# Altium PCB ABPG.PcbDoc (part 1 of 2)
Units mm, origin at the board's own origin, x right, y up, seen from the top; angles counter-clockwise.
Board outline 54.5 x 112.5 mm, 4 copper layers (Top Layer, Layer 1, Layer 2, Bottom Layer), stack 0.603 mm thick; 177 components, 78 nets, 524 pads, 877 vias.
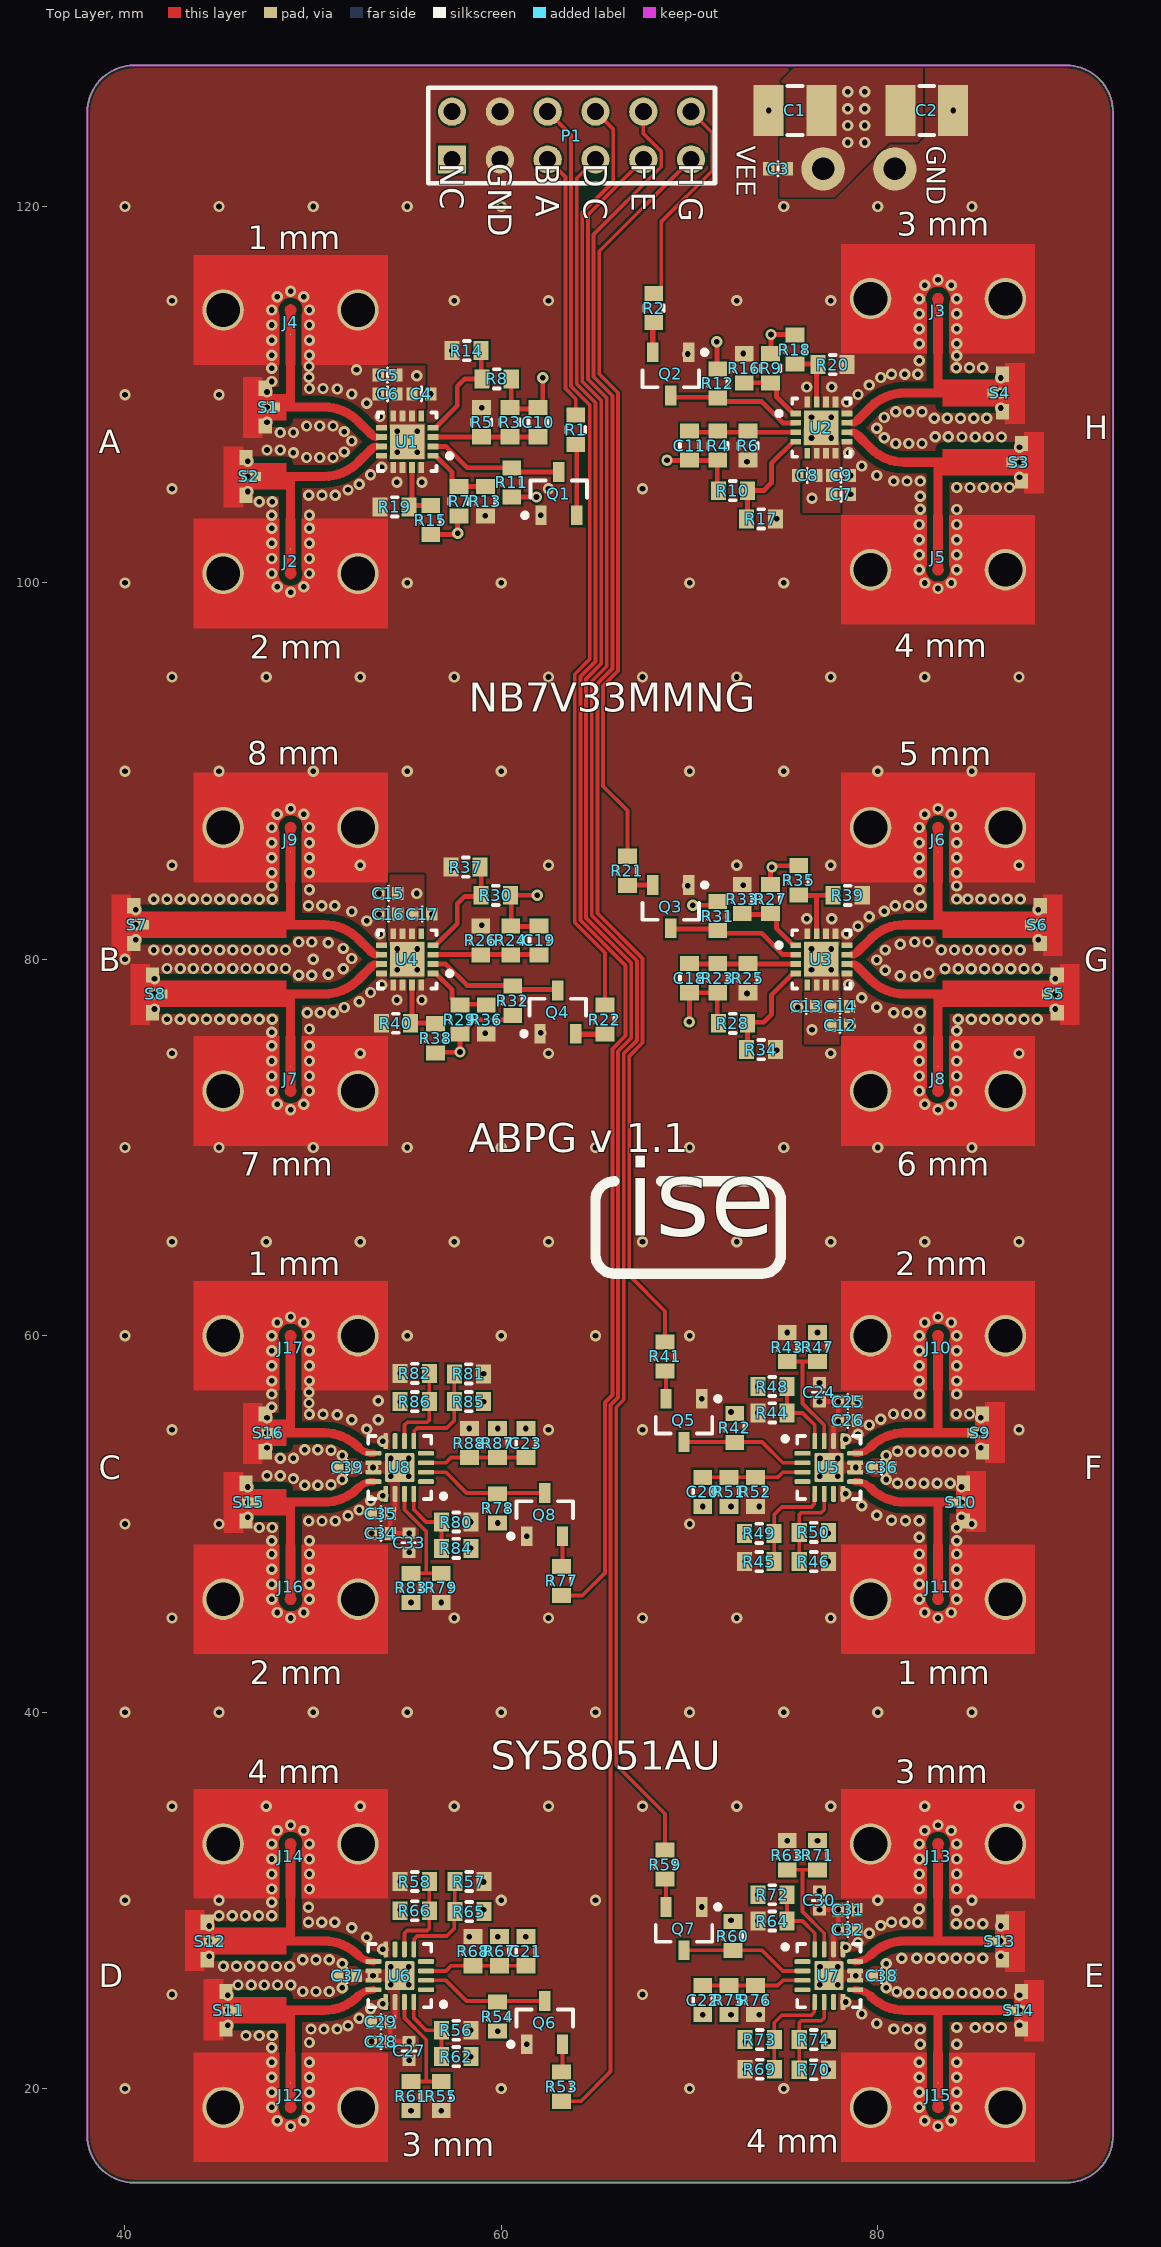
[diagram p0: Top Layer view]
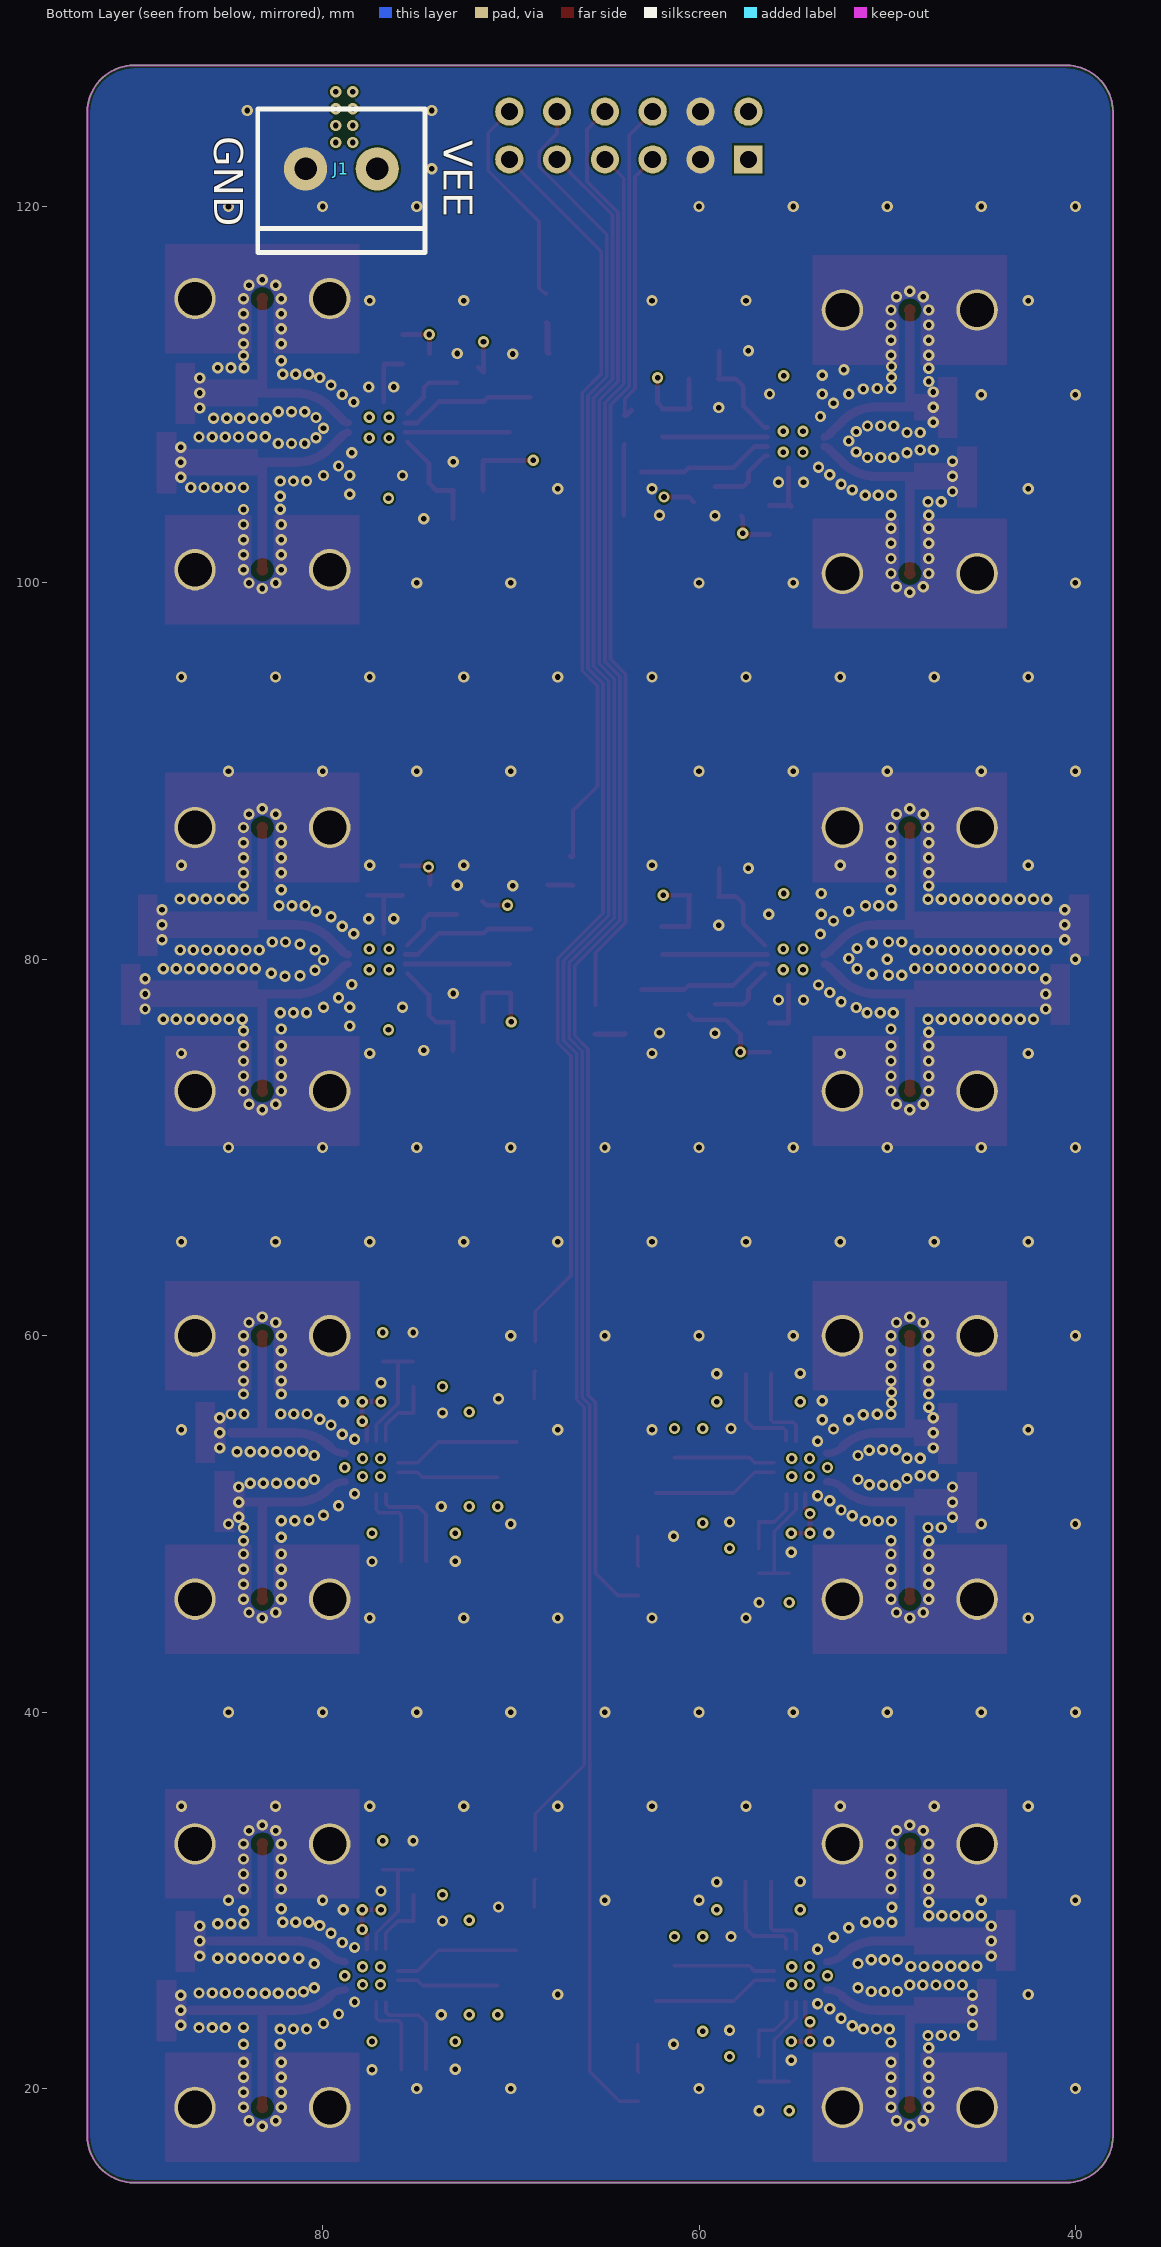
[diagram p1: Bottom Layer view, seen from below]
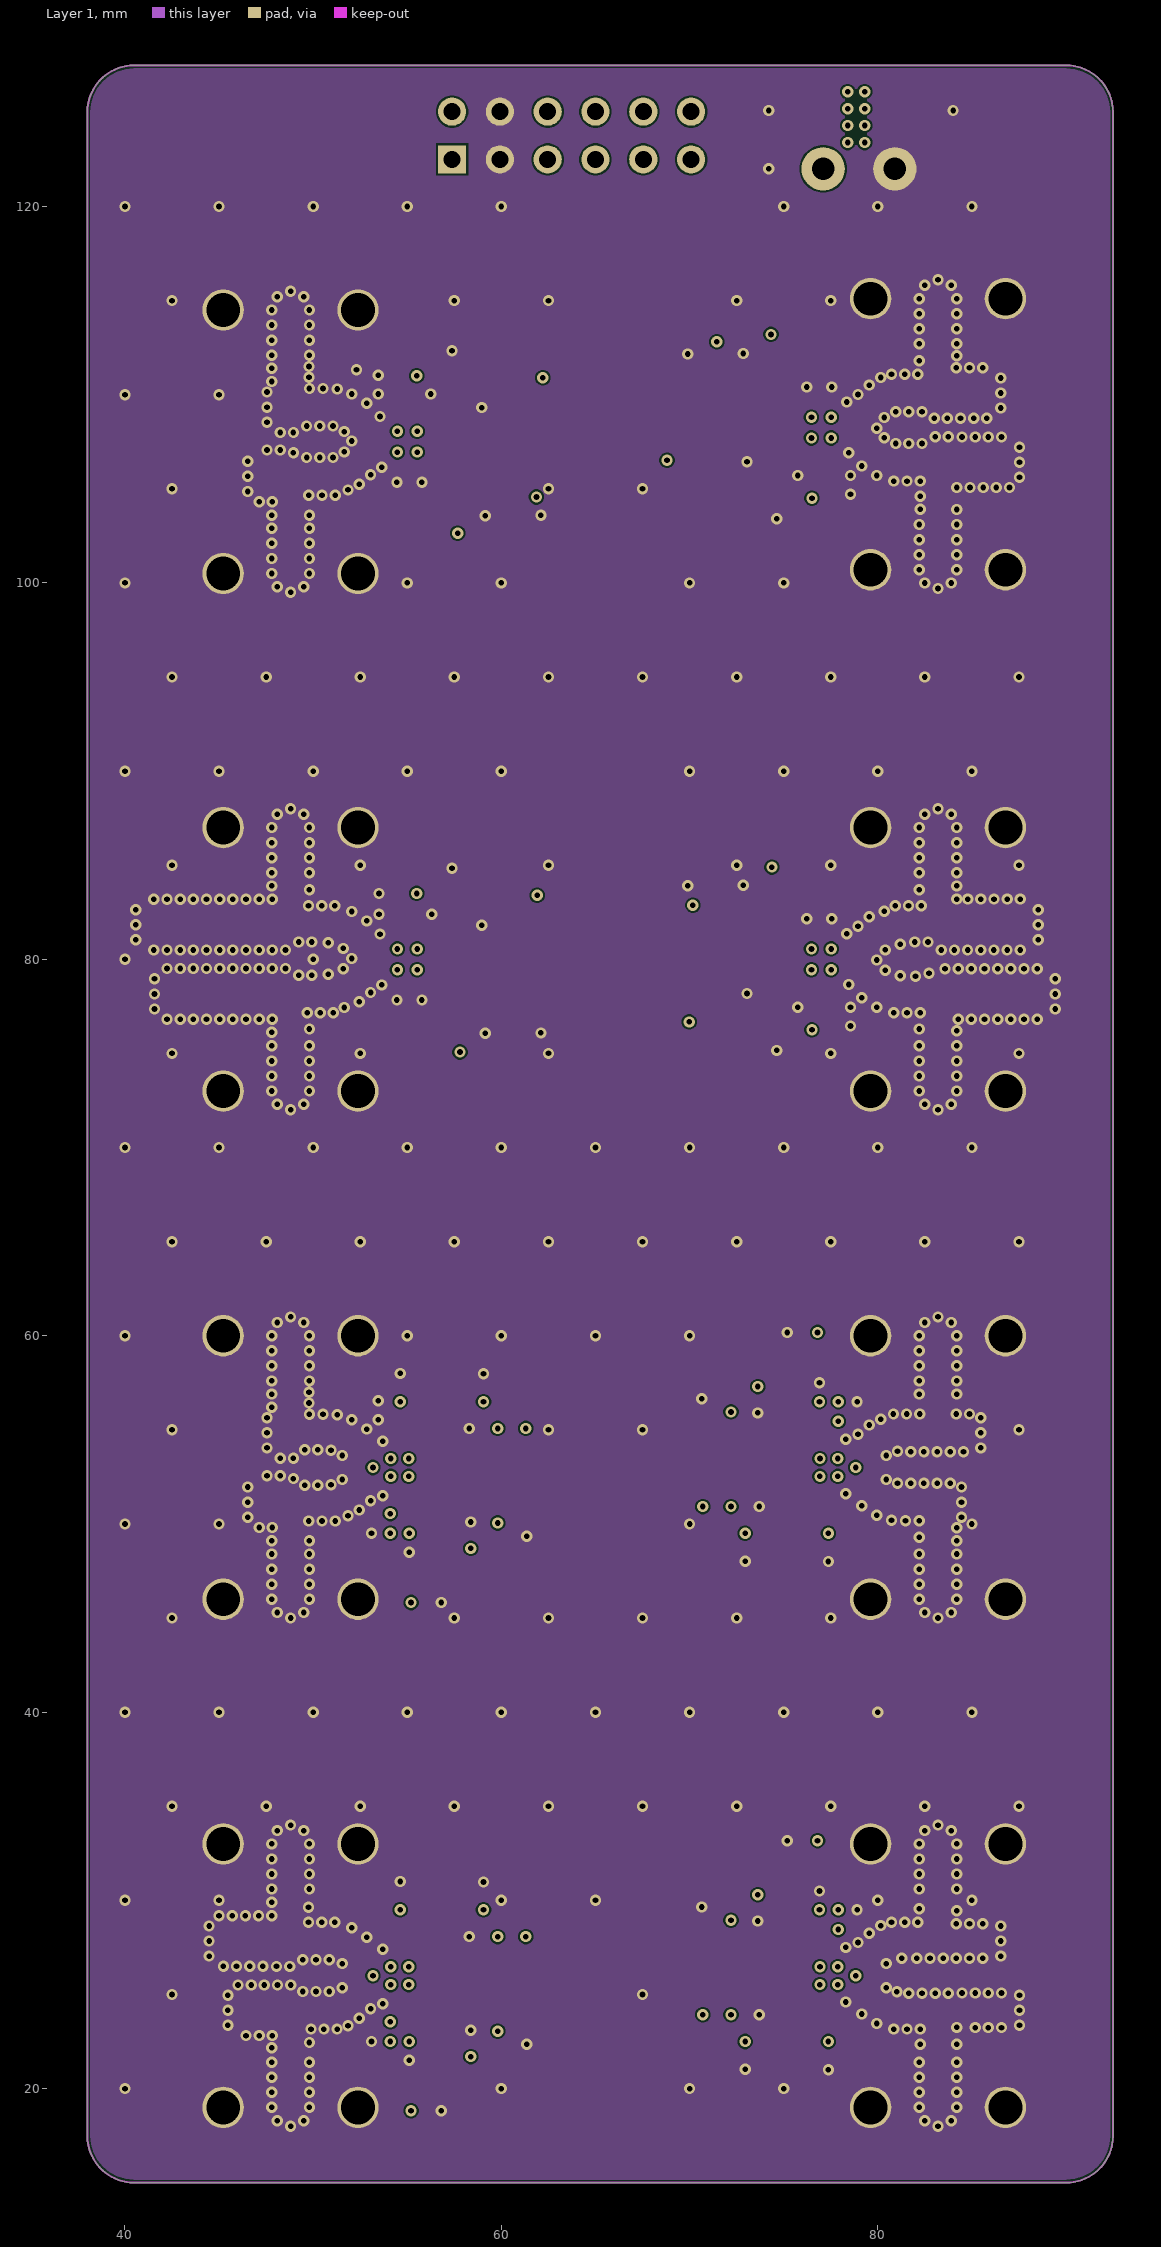
[diagram p2: Layer 1]
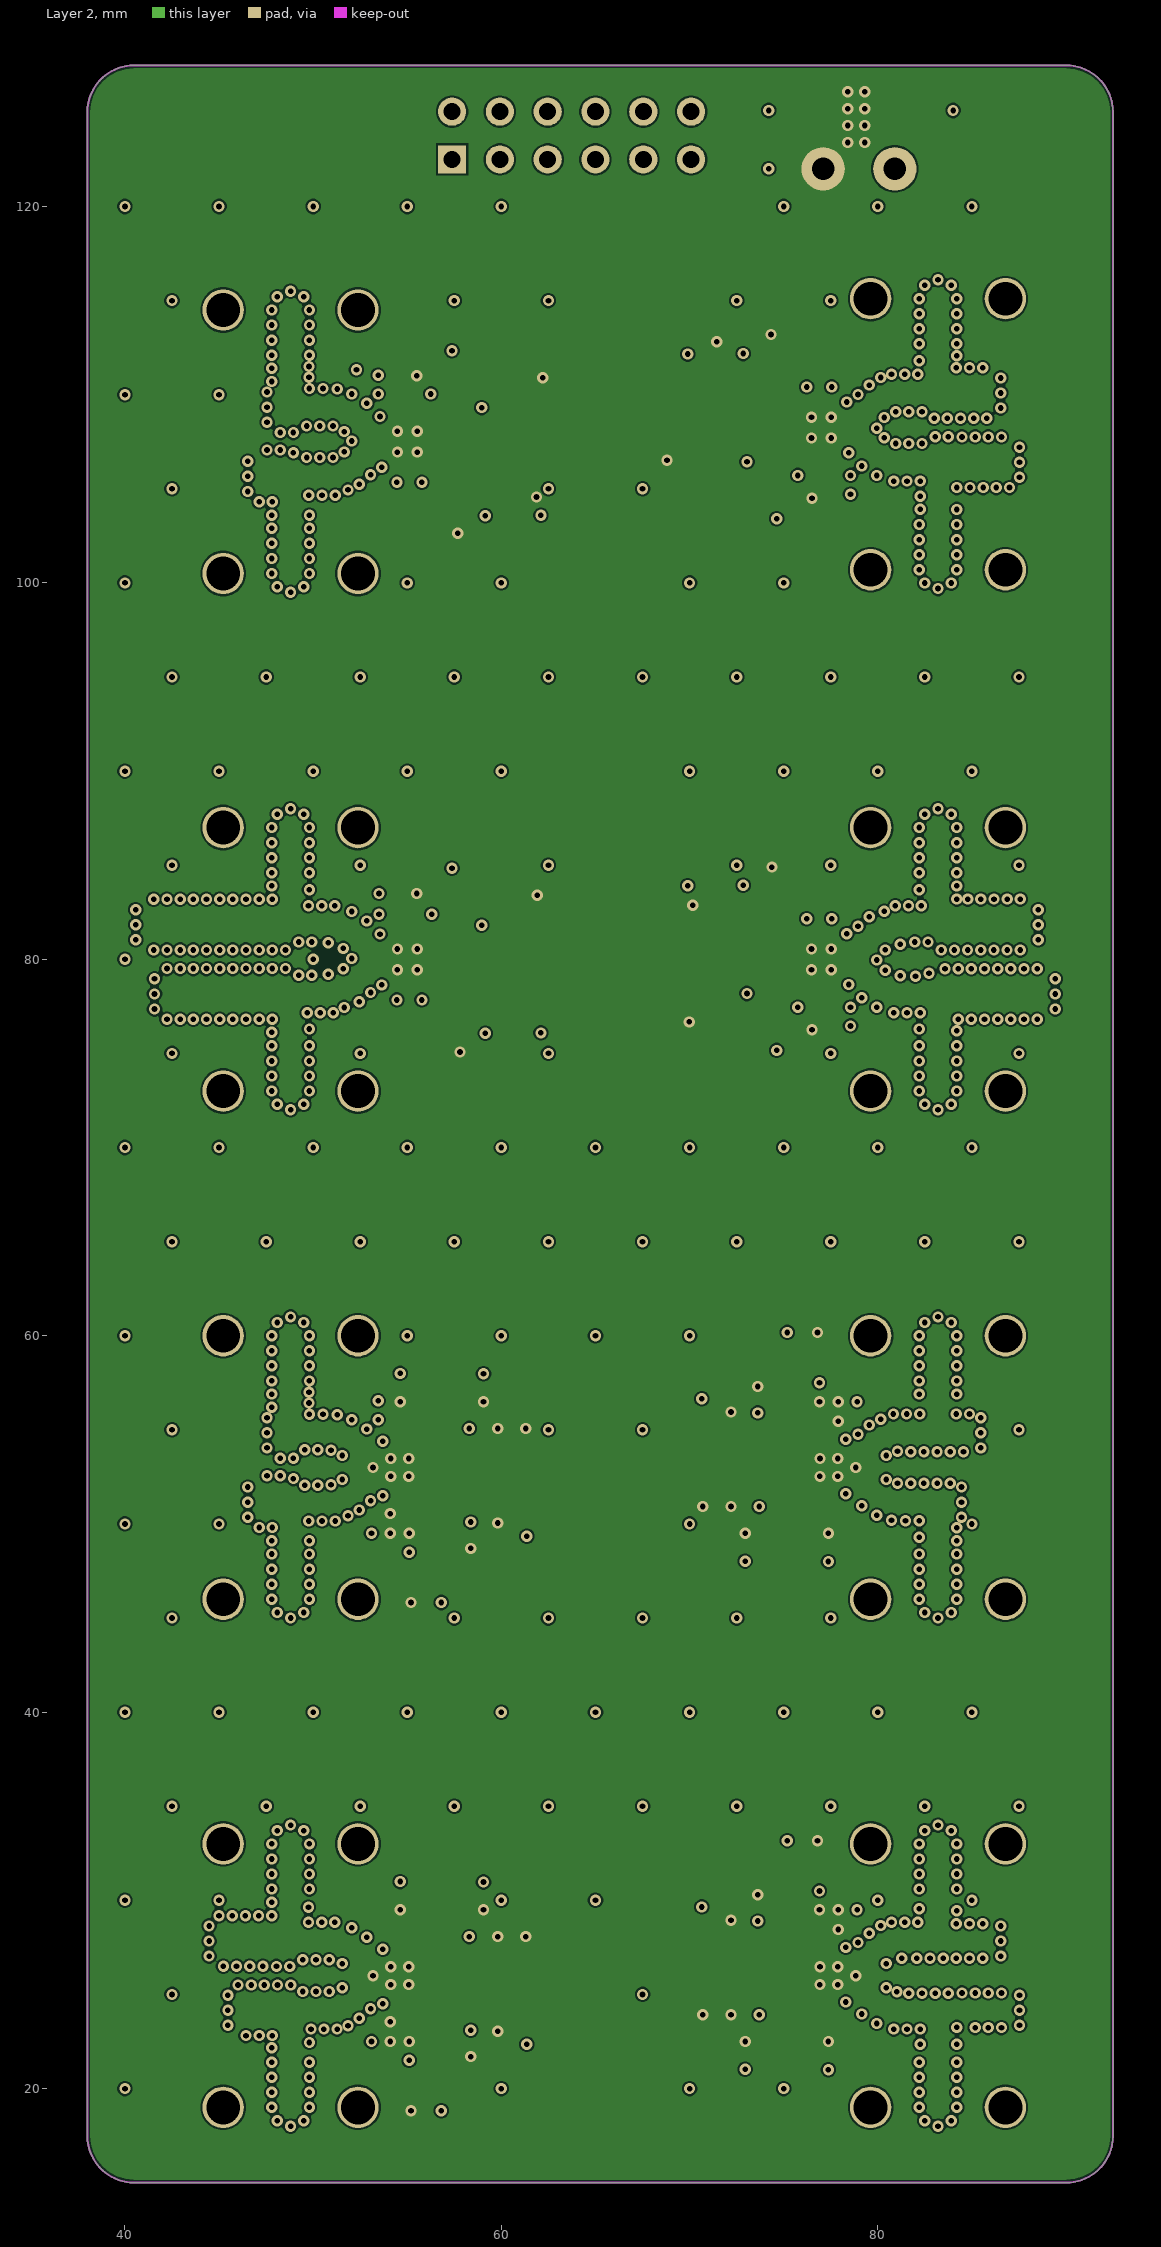
[diagram p3: Layer 2]
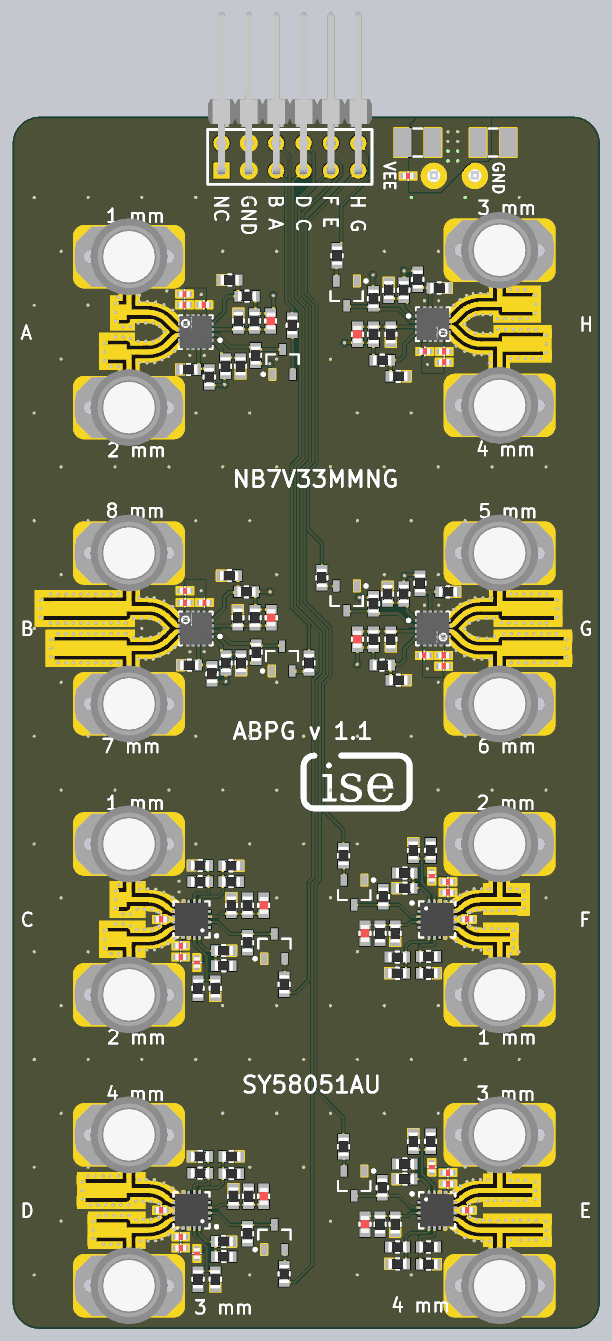
[diagram p5: 3D render of the assembled board from above, using the file's embedded part models]

## Layer stack, top to bottom
Top Solder: solder mask 0.0102, Solder Resist, Dk 3.5
Top Layer: signal copper 0.0356
Dielectric 2: prepreg 0.0711, PP-006, Dk 4.1
Layer 1: signal copper 0.035
Dielectric 1: dielectric 0.32, FR-4, Dk 4.8
Layer 2: signal copper 0.035
Dielectric 5: prepreg 0.0711, PP-006, Dk 4.1
Bottom Layer: signal copper 0.0356
Bottom Solder: solder mask 0.0102, Solder Resist, Dk 3.5

## Board outline
38,17.5 38,125 cw(c40.5,125) 40.5,127.5 90,127.5 cw(c90,125) 92.5,125 92.5,17.5 cw(c90,17.5) 90,15 40.5,15 cw(c40.5,17.5)

## Design rules (kind name [scope] priority, off if disabled: settings)
Clearance Clearance_50_50 [InNetClass('50 ohm') vs InNetClass('50 ohm')] p1: gap=0.1 ignorepadtopadclearanceinfootprint=FALSE
Clearance Clearance_50_U1U2U3U4 [InNetClass('50 ohm') vs (InComponent('U1') OR InComponent('U2') OR InComponent('U3')  OR InComponent('U4')  OR InComponent('U5')  OR InComponent('U7')  OR InComponent('U6')  OR InComponent('U8'))] p2: gap=0.1 ignorepadtopadclearanceinfootprint=FALSE
Clearance Clearance_50 [InNetClass('50 ohm')] p3: gap=0.34 ignorepadtopadclearanceinfootprint=FALSE except(0.2: Arc-SMDPad Track-SMDPad SMDPad-Via; 0.25: Arc-Via Track-Via)
Clearance [All] p4: gap=0.1 ignorepadtopadclearanceinfootprint=FALSE
Clearance Clearance_1 [(InComponent('S1') Or InComponent('S2') Or InComponent('S3') Or InComponent('S4') Or InComponent('S5') Or InComponent('S6') Or InComponent('S7') Or InComponent('S8'))] p5: gap=0 ignorepadtopadclearanceinfootprint=FALSE
ComponentClearance [All] p1: gap=-100 collisioncheckmode=3 verticalgap=-100 showdistances=FALSE
MinimumAnnularRing [All] p1: minimumring=0.15
PolygonConnect [All] p1: connectstyle=Direct reliefconductorwidth=0.254 reliefentries=4 polygonreliefangle="90 Angle" airgapwidth=0.254
RoomDefinition ABPG_TOP [InComponentClass('ABPG_TOP')] p1: confinementstyle=ConfineOut formatcopy=TRUE lockcomponents=FALSE outline 177.673,0 633.476,0 633.476,18.923 177.673,18.923
RoutingVias [All] p1: holewidth=0.3 width=0.6 viastyle="Through Hole" minholewidth=0.3 minwidth=0.6 maxholewidth=0.3 maxwidth=100
ShortCircuit ShortCircuit_2 [InNet('NetJ8_1')  and IsFill vs InNet('GND')] p1: allowed=FALSE
ShortCircuit ShortCircuit_1 [(InComponent('S1') Or InComponent('S2') Or InComponent('S3') Or InComponent('S4') Or InComponent('S5') Or InComponent('S6') Or InComponent('S7') Or InComponent('S8') Or InComponent('S9') Or InComponent('S10') Or InComponent('S11') Or InComponent('S12') Or InComponent('S13') Or InComponent('S14') Or InComponent('S15') Or InComponent('S16'))] p2: allowed=TRUE
ShortCircuit [All] p3: allowed=FALSE
SolderMaskExpansion [All] p1: expansion=0.075 istentingtop=FALSE
SupplyNets "Schematic Supply Nets_1" [InNet('VEE')] p1: voltage=0.000
SupplyNets "Schematic Supply Nets" [InNet('GND')] p2: voltage=0.000
Width Width_50Ohm [InNetClass('50 ohm')] p1: maxlimit=0.49 minlimit=0.4 preferedwidth=0.49 midlayer1_minwidth=0.49 midlayer2_minwidth=0.49 bottomlayer_minwidth=0.49 minimp=50.000000 maximp=50.000000 favimp=50.000000
Width [All] p2: maxlimit=100 minlimit=0.2 preferedwidth=0.5
28 further rules are at their usual default settings.

## Classes and differential pairs
net class "50 ohm": NetJ2_1 NetJ3_1 NetJ4_1 NetJ5_1 NetJ6_1 NetJ7_1 NetJ8_1 NetJ9_1 NetJ10_1 NetJ11_1 NetJ12_1 NetJ13_1 NetJ14_1 NetJ15_1 NetJ16_1 NetJ17_1

## Components (designator, comment, footprint, x,y, rotation, side; value= is the part's Value field where it differs from the comment)
C1 "22 uF" C1210 75.6,125.1 r180 top
C2 "22 uF" C1210 82.6,125.1 r0 top
C3 "100 nF" C0402 74.7,122 r180 top
C4 "100 nF" C0402 55.75,110.04 r0 top
C5 "1 nF" C0402 53.95,111.04 r180 top
C6 "100 pF" C0402 53.95,110.04 r180 top
C7 "100 nF" C0402 78.05,104.71 r0 top
C8 "1 nF" C0402 76.25,105.71 r180 top
C9 "100 pF" C0402 78.05,105.71 r0 top
C10 "100 nF" 0603-Capacitor 61.95,108.54 r270 top
C11 "100 nF" 0603-Capacitor 70,107.3 r90 top
C12 "100 nF" C0402 78,76.5 r0 top
C13 "1 nF" C0402 76.2,77.5 r180 top
C14 "100 pF" C0402 78,77.5 r0 top
C15 "100 nF" C0402 54,83.5 r180 top
C16 "1 nF" C0402 54,82.4 r180 top
C17 "100 pF" C0402 55.8,82.4 r0 top
C18 "100 nF" 0603-Capacitor 70,79 r90 top
C19 "100 nF" 0603-Capacitor 62,81 r270 top
C20 "100 nF" 0603-Capacitor 70.7,51.7 r270 top
C21 "100 nF" 0603-Capacitor 61.3,27.3 r90 top
C22 "100 nF" 0603-Capacitor 70.7,24.7 r270 top
C23 "100 nF" 0603-Capacitor 61.3,54.3 r90 top
C24 "100 nF" C0402 76.9,57 r90 top
C25 "1 nF" C0402 78.4,56.5 r0 top
C26 "100 pF" C0402 78.4,55.5 r0 top
C27 "100 nF" C0402 55.1,22 r270 top
C28 "1 nF" C0402 53.6,22.5 r180 top
C29 "100 pF" C0402 53.6,23.55 r180 top
C30 "100 nF" C0402 76.9,30 r90 top
C31 "1 nF" C0402 78.4,29.5 r0 top
C32 "100 pF" C0402 78.4,28.45 r0 top
C33 "100 nF" C0402 55.1,49 r270 top
C34 "1 nF" C0402 53.6,49.5 r180 top
C35 "100 pF" C0402 53.6,50.55 r180 top
C36 "100 pF" C0402 80.2,53 r0 top
C37 "100 pF" C0402 51.8,26 r180 top
C38 "100 pF" C0402 80.2,26 r0 top
C39 "100 pF" C0402 51.8,53 r180 top
J1 "1803426" 1803426 79,122 r180 bottom
J2 "SF1621-60026" SF1621-60026-RO4350-0.254 48.8,100.5 r180 top
J3 "SF1621-60026" SF1621-60026-RO4350-0.254 83.2,115.1 r0 top
J4 "SF1621-60026" SF1621-60026-RO4350-0.254 48.8,114.5 r0 top
J5 "SF1621-60026" SF1621-60026-RO4350-0.254 83.2,100.7 r180 top
J6 "SF1621-60026" SF1621-60026-RO4350-0.254 83.2,87 r0 top
J7 "SF1621-60026" SF1621-60026-RO4350-0.254 48.8,73 r180 top
J8 "SF1621-60026" SF1621-60026-RO4350-0.254 83.2,73 r180 top
J9 "SF1621-60026" SF1621-60026-RO4350-0.254 48.8,87 r0 top
J10 "SF1621-60026" SF1621-60026-RO4350-0.254 83.2,60 r0 top
J11 "SF1621-60026" SF1621-60026-RO4350-0.254 83.2,46 r180 top
J12 "SF1621-60026" SF1621-60026-RO4350-0.254 48.8,19 r180 top
J13 "SF1621-60026" SF1621-60026-RO4350-0.254 83.2,33 r0 top
J14 "SF1621-60026" SF1621-60026-RO4350-0.254 48.8,33 r0 top
J15 "SF1621-60026" SF1621-60026-RO4350-0.254 83.2,19 r180 top
J16 "SF1621-60026" SF1621-60026-RO4350-0.254 48.8,46 r180 top
J17 "SF1621-60026" SF1621-60026-RO4350-0.254 48.8,60 r0 top
P1 "PBC06DGAN" PBC06DGAN 57.38,122.5 r0 top
Q1 "BC857C" INF-SOT23_N 63.05,104.74 r90 top
Q2 "BC857C" INF-SOT23_N 69,111.1 r270 top
Q3 "BC857C" INF-SOT23_N 69,82.8 r270 top
Q4 "BC857C" INF-SOT23_N 63,77.2 r90 top
Q5 "BC857C" INF-SOT23_N 69.7,55.5 r270 top
Q6 "BC857C" INF-SOT23_N 62.3,23.5 r90 top
Q7 "BC857C" INF-SOT23_N 69.7,28.5 r270 top
Q8 "BC857C" INF-SOT23_N 62.3,50.5 r90 top
R1 "250r" 0603-Resistor 63.95,108.14 r90 top
R2 "250r" 0603-Resistor 68.1,114.6 r90 top
R3 "1k" 0603-Resistor 60.45,108.54 r90 top
R4 "1k" 0603-Resistor 71.5,107.3 r270 top
R5 "1k5" 0603-Resistor 58.95,108.54 r90 top
R6 "1k5" 0603-Resistor 73.1,107.3 r270 top
R7 "DNP" 0603-Resistor 57.75,104.34 r90 top
R8 "DNP" 0603-Resistor 59.75,110.84 r180 top
R9 "DNP" 0603-Resistor 74.3,111.4 r270 top
R10 "DNP" 0603-Resistor 72.3,104.9 r0 top
R11 "250r" 0603-Resistor 60.55,105.34 r270 top
R12 "250r" 0603-Resistor 71.5,110.6 r90 top
R13 "DNP" 0603-Resistor 59.15,104.34 r270 top
R14 "DNP" 0603-Resistor 58.15,112.34 r180 top
R15 "*" 0603-Resistor 56.25,103.34 r270 top
R16 "DNP" 0603-Resistor 72.9,111.4 r90 top
R17 "DNP" 0603-Resistor 73.8,103.4 r0 top
R18 "*" 0603-Resistor 75.6,112.4 r90 top
R19 "*" 0603-Resistor 54.325,104.04 r180 top
R20 "*" 0603-Resistor 77.6,111.6 r0 top
R21 "250r" 0603-Resistor 66.7,84.7 r90 top
R22 "250r" 0603-Resistor 65.5,76.8 r90 top
R23 "1k" 0603-Resistor 71.5,79 r270 top
R24 "1k" 0603-Resistor 60.5,81 r90 top
R25 "1k5" 0603-Resistor 73.1,79 r270 top
R26 "1k5" 0603-Resistor 58.9,81 r90 top
R27 "DNP" 0603-Resistor 74.3,83.2 r270 top
R28 "DNP" 0603-Resistor 72.3,76.6 r0 top
R29 "DNP" 0603-Resistor 57.8,76.8 r90 top
R30 "DNP" 0603-Resistor 59.7,83.4 r180 top
R31 "250r" 0603-Resistor 71.5,82.3 r90 top
R32 "250r" 0603-Resistor 60.6,77.8 r270 top
R33 "DNP" 0603-Resistor 72.8,83.2 r90 top
R34 "DNP" 0603-Resistor 73.8,75.2 r0 top
R35 "*" 0603-Resistor 75.8,84.2 r90 top
R36 "DNP" 0603-Resistor 59.2,76.8 r270 top
R37 "DNP" 0603-Resistor 58.1,84.9 r180 top
R38 "*" 0603-Resistor 56.5,75.8 r270 top
R39 "*" 0603-Resistor 78.4,83.4 r0 top
R40 "*" 0603-Resistor 54.4,76.6 r180 top
R41 "250r" 0603-Resistor 68.7,58.9 r90 top
R42 "250r" 0603-Resistor 72.4,55.1 r90 top
R43 "0r" 0603-Resistor 75.192,59.4 r90 top
R44 "DNP" 0603-Resistor 74.4,55.9 r0 top
R45 "0r" 0603-Resistor 73.7,48 r0 top
R46 "DNP" 0603-Resistor 76.6,48 r0 top
R47 "DNP" 0603-Resistor 76.8,59.4 r90 top
R48 "1k" 0603-Resistor 74.4,57.3 r0 top
R49 "DNP" 0603-Resistor 73.7,49.5 r0 top
R50 "1k" 0603-Resistor 76.601,49.552 r0 top
R51 "330r" 0603-Resistor 72.1,51.7 r270 top
R52 "330r" 0603-Resistor 73.5,51.7 r270 top
R53 "250r" 0603-Resistor 63.2,20.1 r270 top
R54 "250r" 0603-Resistor 59.8,23.825 r270 top
R55 "0r" 0603-Resistor 56.808,19.6 r270 top
R56 "DNP" 0603-Resistor 57.6,23.1 r180 top
R57 "0r" 0603-Resistor 58.3,31 r180 top
R58 "DNP" 0603-Resistor 55.399,30.999 r180 top
R59 "250r" 0603-Resistor 68.7,31.9 r90 top
R60 "250r" 0603-Resistor 72.3,28.1 r90 top
R61 "DNP" 0603-Resistor 55.2,19.6 r270 top
R62 "1k" 0603-Resistor 57.6,21.7 r180 top
R63 "0r" 0603-Resistor 75.192,32.4 r90 top
R64 "DNP" 0603-Resistor 74.4,28.9 r0 top
R65 "DNP" 0603-Resistor 58.3,29.4 r180 top
R66 "1k" 0603-Resistor 55.399,29.448 r180 top
R67 "330r" 0603-Resistor 59.9,27.3 r90 top
R68 "330r" 0603-Resistor 58.5,27.3 r90 top
R69 "0r" 0603-Resistor 73.725,21.025 r0 top
R70 "DNP" 0603-Resistor 76.6,21 r0 top
R71 "DNP" 0603-Resistor 76.8,32.4 r90 top
R72 "1k" 0603-Resistor 74.4,30.3 r0 top
R73 "DNP" 0603-Resistor 73.725,22.6 r0 top
R74 "1k" 0603-Resistor 76.6,22.6 r0 top
R75 "330r" 0603-Resistor 72.1,24.7 r270 top
R76 "330r" 0603-Resistor 73.5,24.7 r270 top
R77 "250r" 0603-Resistor 63.2,46.975 r270 top
R78 "250r" 0603-Resistor 59.8,50.825 r270 top
R79 "0r" 0603-Resistor 56.808,46.6 r270 top
R80 "DNP" 0603-Resistor 57.6,50.1 r180 top
R81 "0r" 0603-Resistor 58.275,57.975 r180 top
R82 "DNP" 0603-Resistor 55.399,57.999 r180 top
R83 "DNP" 0603-Resistor 55.2,46.6 r270 top
R84 "1k" 0603-Resistor 57.6,48.7 r180 top
R85 "DNP" 0603-Resistor 58.275,56.5 r180 top
R86 "1k" 0603-Resistor 55.4,56.5 r180 top
R87 "330r" 0603-Resistor 59.8,54.3 r90 top
R88 "330r" 0603-Resistor 58.3,54.3 r90 top
S1 "Short_RO4350" STD_SHORT 47.85,109.34 r270 top net-tie
S2 "Short_RO4350" STD_SHORT 46.83,105.66 r270 top net-tie
S3 "Short_RO4350" STD_SHORT 87.23,106.41 r90 top net-tie
S4 "Short_RO4350" STD_SHORT 86.23,110.09 r90 top net-tie
S5 "Short_RO4350" STD_SHORT 89.13,78.16 r90 top net-tie
S6 "Short_RO4350" STD_SHORT 88.23,81.84 r90 top net-tie
S7 "Short_RO4350" STD_SHORT 40.87,81.84 r270 top net-tie
S8 "Short_RO4350" STD_SHORT 41.87,78.16 r270 top net-tie
S9 "Short_RO4350" STD_SHORT 85.17,54.84 r90 top net-tie
S10 "Short_RO4350" STD_SHORT 84.15,51.16 r90 top net-tie
S11 "Short_RO4350" STD_SHORT 45.77,24.16 r270 top net-tie
S12 "Short_RO4350" STD_SHORT 44.77,27.84 r270 top net-tie
S13 "Short_RO4350" STD_SHORT 86.23,27.84 r90 top net-tie
S14 "Short_RO4350" STD_SHORT 87.23,24.16 r90 top net-tie
S15 "Short_RO4350" STD_SHORT 46.83,51.16 r270 top net-tie
S16 "Short_RO4350" STD_SHORT 47.85,54.84 r270 top net-tie
U1 "NB7V33MMNG" FP-485G-01-MFG 55,107.5 r180 top
U2 "NB7V33MMNG" FP-485G-01-MFG 77,108.25 r0 top
U3 "NB7V33MMNG" FP-485G-01-MFG 77,80 r0 top
U4 "NB7V33MMNG" FP-485G-01-MFG 55,80 r180 top
U5 "SY58051AU" QFN50P300X300X90_HS-17N 77.4,53 r0 top
U6 "SY58051AU" QFN50P300X300X90_HS-17N 54.6,26 r180 top
U7 "SY58051AU" QFN50P300X300X90_HS-17N 77.4,26 r0 top
U8 "SY58051AU" QFN50P300X300X90_HS-17N 54.6,53 r180 top

## Footprints (in the part's own frame and the unit in brackets; to place one, negate y for a bottom-side part, rotate by r counter-clockwise, add the part's x,y. Pads: shape width x height; smd on the part's side, far side on the other; paste and mask are expansions set on the pad)
0603-Capacitor [mm] "Chip Resistor, 2-Leads, Body 1,6x0,8mm, IPC Medium Density"
  rect 0.8x1 smd: 1(-0.775,0) 2(0.775,0)
  silkscreen extent -0.15,-0.51 0.15,0.51, body extent -0.8,-0.4 0.8,0.4, height 0.3
0603-Resistor [mm] "Chip Resistor, 2-Leads, Body 1,6x0,8mm, IPC Medium Density"
  rect 0.8x1 smd: 1(-0.775,0) 2(0.775,0)
  silkscreen extent -0.15,-0.51 0.15,0.51, body extent -0.85,-0.45 0.85,0.45, height 0.55
1803426 [mm]
  round 2.3 hole 1.2: 1(1.905,0) 2(-1.905,0)
  silkscreen extent -4.45,-4.45 4.45,3.18, body extent -4.51,-4.2 4.5,3.05, height 9.2
C0402 [mm] "Chip Capacitor, 2-Leads, Body 1,00x0,50mm, IPC Medium Density"
  rect 0.6x0.7 smd paste-0.1: 1(-0.5,0) 2(0.5,0)
  silkscreen extent 0,-0.38 0,0.38, body extent -0.5,-0.3 0.5,0.3, height 0.2
C1210 [mm]
  rect 1.6x2.7 smd: 1(-1.4,0) 2(1.4,0)
  silkscreen extent -0.4,-1.3 0.4,1.3, body extent -1.8,-1.25 1.8,1.25, height 2.3
FP-485G-01-MFG [mm]
  rect 0.58x0.3 smd paste+0 mask+0: 1(-1.36,0.75) 2(-1.36,0.25) 3(-1.36,-0.25) 4(-1.36,-0.75) 9(1.36,-0.75) 10(1.36,-0.25) 11(1.36,0.25) 12(1.36,0.75)
  rect 0.3x0.58 smd paste+0 mask+0: 5(-0.75,-1.36) 6(-0.25,-1.36) 7(0.25,-1.36) 8(0.75,-1.36) 13(0.75,1.36) 14(0.25,1.36) 15(-0.25,1.36) 16(-0.75,1.36)
  rect 1.84x1.84 smd paste+0 mask+0: 17(0,0)
  silkscreen extent -2.38,-1.55 1.55,1.55, body extent -1.75,-1.75 1.75,1.75, height 0.25
INF-SOT23_N [mm] "SOT23, 3-Leads, Body 2.9x1.3 mm, Pitch 0.95 mm, IPC Medium Density"
  rect 1.05x0.6 smd: 1(-1.15,0.95) 2(-1.15,-0.95) 3(1.15,0)
  silkscreen extent -1.27,-1.5 0.7,1.92, body extent -0.7,-1.5 0.7,1.5, height 1.1
PBC06DGAN [mm]
  rect 1.5x1.5 hole 0.9: 1(0,0)
  round 1.5 hole 0.9: 2(0,2.54) 3(2.54,0) 4(2.54,2.54) 5(5.08,0) 6(5.08,2.54) 7(7.62,0) 8(7.62,2.54) 9(10.16,0) 10(10.16,2.54) 11(12.7,0) 12(12.7,2.54)
  silkscreen extent -1.27,-1.27 13.97,3.81, body extent -1.27,-0.32 13.97,14.68, height 6.25
QFN50P300X300X90_HS-17N [mm] "QFN, 16-Leads, Body 3,00x3,00mm, Pitch 0,50mm, Thermal Pad 1,55x1,55mm, IPC Medium Density"
  rrect50% 0.85x0.25 smd: 1(-1.4,0.75) 2(-1.4,0.25) 3(-1.4,-0.25) 4(-1.4,-0.75) 9(1.4,-0.75) 10(1.4,-0.25) 11(1.4,0.25) 12(1.4,0.75)
  rrect50% 0.25x0.85 smd: 5(-0.75,-1.4) 6(-0.25,-1.4) 7(0.25,-1.4) 8(0.75,-1.4) 13(0.75,1.4) 14(0.25,1.4) 15(-0.25,1.4) 16(-0.75,1.4)
  rrect10% 1.55x1.55 smd: 17(0,0)
  silkscreen extent -2.45,-1.68 1.68,1.68, body extent -1.53,-1.53 1.53,1.53, height 0.9
SF1621-60026-RO4350-0.254 [mm]
  round 2.2 hole 1.8 paste-2539.97 mask+0: 0(-3.58,0) 0(3.58,0)
  round 0.025 smd paste-2539.97 mask+0: 1(0,-1.3)
  Top Layer region: -0.245,-2.9 -0.245,-0.173 -0.245,-0.173 -0.297,-0.039 -0.281,0.105 -0.2,0.224 -0.072,0.291 0.072,0.291 0.2,0.224 0.281,0.105 0.297,-0.039 0.245,-0.173 0.245,-0.173 0.245,-2.9
  Top Layer region: -5.15,-2.9 -5.15,2.9 5.15,2.9 5.15,-2.9 0.595,-2.9 0.595,-0.262 0.648,0.053 0.544,0.355 0.31,0.572 0,0.65 -0.31,0.572 -0.544,0.355 -0.648,0.053 -0.595,-0.262 -0.595,-0.262 -0.595,-2.9
  Top Layer pour cut-out: -1.5,-2 -1.5,1.5 1.5,1.5 1.5,-2
  Bottom Layer pour cut-out: 0,-0.6 -0.23,-0.554 -0.424,-0.424 -0.554,-0.23 -0.6,0 -0.6,0 -0.554,0.23 -0.424,0.424 -0.23,0.554 0,0.6 0,0.6 0.23,0.554 0.424,0.424 0.554,0.23 0.6,0 0.6,0 0.554,-0.23 0.424,-0.424 0.23,-0.554 0,-0.6
  body extent -5.08,-3.57 5.08,3.57, height 11.2
STD_SHORT [mm]
  rect 0.81x0.7 smd paste-2539.97: 0(-1,-0.4) 0(1,-0.4)
  rect 0.49x1 smd paste-2539.97: 1(0,-0.1)
  Top Layer region: -1,-0.7 1,-0.7 1,0 -1,0

## Part data
C1 C2: library part Capacitor, "Capacitor", Package=1210
C3 C4 C5 C6 C7 C8 C9 C12 C13 C14 C15 C16 C17 C24 C25 C26 C27 C28 C29 C30 C31 C32 C33 C34 C35 C36 C37 C38 C39: library part Capacitor, "Capacitor", Package=0402
C10 C11 C18 C19 C20 C21 C22 C23: library part C0603, "Capacitor", Package=0603, Part Number=C0603, Pin Count=2
J1: "2 Position Terminal Block Header", Manufacturer="Phoenix Contact", Component Type=Standard, Footprint Type="Through hole", ManufacturerNr=1803426, Part Number=1803426, Pin Count=2
J2 J3 J4 J5 J6 J7 J8 J9 J10 J11 J12 J13 J14 J15 J16 J17: "CONN 2.4MM JACK STR 50OHM SCREW", Manufacturer=Amphenol, Component Type=Standard, Footprint Type=SMD, ManufacturerNr=SF1621-60026, Package=SF1621-60026, Part Number=SF1621-60026, Pin Count=2
P1: "Double-row jumper plug (female) 5x2", Manufacturer="Sullins Connector Solutions", Component Type=Standard, Footprint Type=THD, ManufacturerNr=PBC06DGAN, Package=PBC06DGAN, Part Number=PBC06DGAN, Pin Count=12
Q1 Q2 Q3 Q4 Q5 Q6 Q7 Q8: library part CMP-1177-00039-1, "PNP Silicon AF Transistor, 45 V VCEO, 100 mA IC, SOT23, Reel, Green", Manufacturer=Infineon, ComponentLink1Description="Manufacturer URL", ComponentLink1URL=http://www.infineon.com/, ComponentLink2Description=Datasheet, ComponentLink2URL=http://www.infineon.com/dgdl/bc857series_bc858series_bc859series_bc860series.pdf?folderId=db3a304314dca389011541d30fa21656&fileId=db3a304314dca389011541da0e3a1661, ComponentLink3Description="Package Specification", ComponentLink3URL=http://www.infineon.com/dgdl/SOT23-Package_Overview.pdf?folderId=db3a30431936bc4b0119532290053c66&fileId=db3a30431936bc4b0119533468123c85, fT (typ)="250Â MHz", Green=TRUE, IBM (max)="200Â mA", IC (max)="100Â mA", ICBO (max)="15Â nA", ICM (max)="200Â mA", Mounting Technology="Surface Mount", PackageDescription="3-Pin Small Outline Transistor Package, 1.3 x 2.9 mm Body, 0.95 mm Pitch", PackageReference=SOT23, PackageVersion=Apr-08, Packing=Reel, PartNumber=BC857C, Polarity=PNP, Ptot (max)="330Â mW", VCBO (max)="50Â V", VCEO (max)="45Â V", VEBO (max)="5Â V"
R1 R2 R3 R4 R5 R6 R7 R8 R9 R10 R11 R12 R13 R14 R15 R16 R17 R18 R19 R20 R21 R22 R23 R24 R25 R26 R27 R28 R29 R30 R31 R32 R33 R34 R35 R36 R37 R38 R39 R40 R41 R42 R43 R44 R45 R46 R47 R48 R49 R50 R51 R52 R53 R54 R55 R56 R57 R58 R59 R60 R61 R62 R63 R64 R65 R66 R67 R68 R69 R70 R71 R72 R73 R74 R75 R76 R77 R78 R79 R80 R81 R82 R83 R84 R85 R86 R87 R88: library part R0603, "Resistor", Package=0603, Part Number=R0603, Pin Count=2
U1 U2 U3 U4: library part CMP-07066-000001-1, "IC CLK DIVIDER 1:1 10GHZ 16QFN", Ambient Temperature Range High=+85°C, Ambient Temperature Range Low=-40°C, Manufacturer="ON Semiconductor", Max Supply Voltage=2.625V, Min Supply Voltage=1.71V, Nominal Supply Current=85-95mA, Package=485G-01, Temperature="-40°C to +85°C", Automotive=No, Category=IC, ComponentLink2Description=Datasheet, ComponentLink2URL=https://www.onsemi.com/pub/Collateral/NB7V33M-D.PDF, Device Class L1="Integrated Circuits (ICs)", Device Class L2="Clock and Timing", Device Class L3=Drivers, Digikey Description="IC CLK DIVIDER 1:1 10GHZ 16QFN", Footprint Url=https://www.onsemi.com/pub/Collateral/485G-01.PDF, Height=1mm, Ipc Land Pattern Name=QFN50P300X300X90-16, Lead Free=Yes, Manufacturer Part Number=NB7V33MMNG, Mouser Description="Clock Drivers & Distribution 1.8V / 2.5V 10GHz", Number Of Elements=1, Number Of Inputs=1, Number of Outputs=1, Octopart=https://octopart.com/nb7v33mmng-on+semiconductor-15753900, Propagation Delay=0.26ns, RoHS=TRUE, Standoff Height=0mm, Temperature Range High=+85°C, Temperature Range Low=-40°C
U5 U6 U7 U8: "Ultra-Precision CML AnyGate® with Internal Input and Output Termination", Manufacturer="Microchip / Micrel", Manufacturer Part Number=SY58051AU

## Via types
v1: diameter 0.6, hole 0.3, Top Layer to Bottom Layer, tented both sides, 877 vias

## Nets (pads, with @x,y where several pads share a name; then routed paths per layer and width w, separated by ;. In a path a pad name is that pad's centre, name@x,y a point inside that pad or via, vN(x,y) a via of type N, cw(c..) or ccw(c..) an arc to the next point about the centre after c; other vN are vias at no path point)
A1_N: R64.2 R72.2 U7.16 | length 4
  Top Layer w0.2: R72.2@75.175,30.3 R64.2@75.175,28.9 76,28.9 76.65,28.25 U7.16@76.65,27.4
A1_P: R63.1 R71.1 U7.15 | length 6.3
  Top Layer w0.2: R63.1@75.192,31.625 75.996,31.625 ; R71.1@76.8,31.625 75.996,31.625 ; U7.15@77.15,27.4 77.15,28.25 75.996,29.404 75.996,31.625
A2_N: R80.2 R84.2 U8.16 | length 4
  Top Layer w0.2: U8.16@55.35,51.6 55.35,50.75 56,50.1 R80.2@56.825,50.1 R84.2@56.825,48.7
A2_P: R79.1 R83.1 U8.15 | length 6.3
  Top Layer w0.2: U8.15@54.85,51.6 54.85,50.75 56.004,49.596 56.004,47.375 ; R83.1@55.2,47.375 56.004,47.375 ; R79.1@56.808,47.375 56.004,47.375
A3_N: R44.2 R48.2 U5.16 | length 4
  Top Layer w0.2: R48.2@75.175,57.3 R44.2@75.175,55.9 76,55.9 76.65,55.25 U5.16@76.65,54.4
A3_P: R43.1 R47.1 U5.15 | length 6.3
  Top Layer w0.2: R43.1@75.192,58.625 75.996,58.625 ; R47.1@76.8,58.625 75.996,58.625 ; U5.15@77.15,54.4 77.15,55.25 75.996,56.404 75.996,58.625
A4_N: R56.2 R62.2 U6.16 | length 4
  Top Layer w0.2: U6.16@55.35,24.6 55.35,23.75 56,23.1 R56.2@56.825,23.1 R62.2@56.825,21.7
A4_P: R55.1 R61.1 U6.15 | length 6.3
  Top Layer w0.2: U6.15@54.85,24.6 54.85,23.75 56.004,22.596 56.004,20.375 ; R61.1@55.2,20.375 56.004,20.375 ; R55.1@56.808,20.375 56.004,20.375